# Altium PCB MainController.PcbDoc
Units mm, origin at the board's own origin, x right, y up, seen from the top; angles counter-clockwise.
Board outline 106.75 x 62.05 mm, 4 copper layers (Top Layer, Int1 (GND), Int2 (GND), Bottom Layer), stack 1.369 mm thick; 112 components, 77 nets, 350 pads, 67 vias.
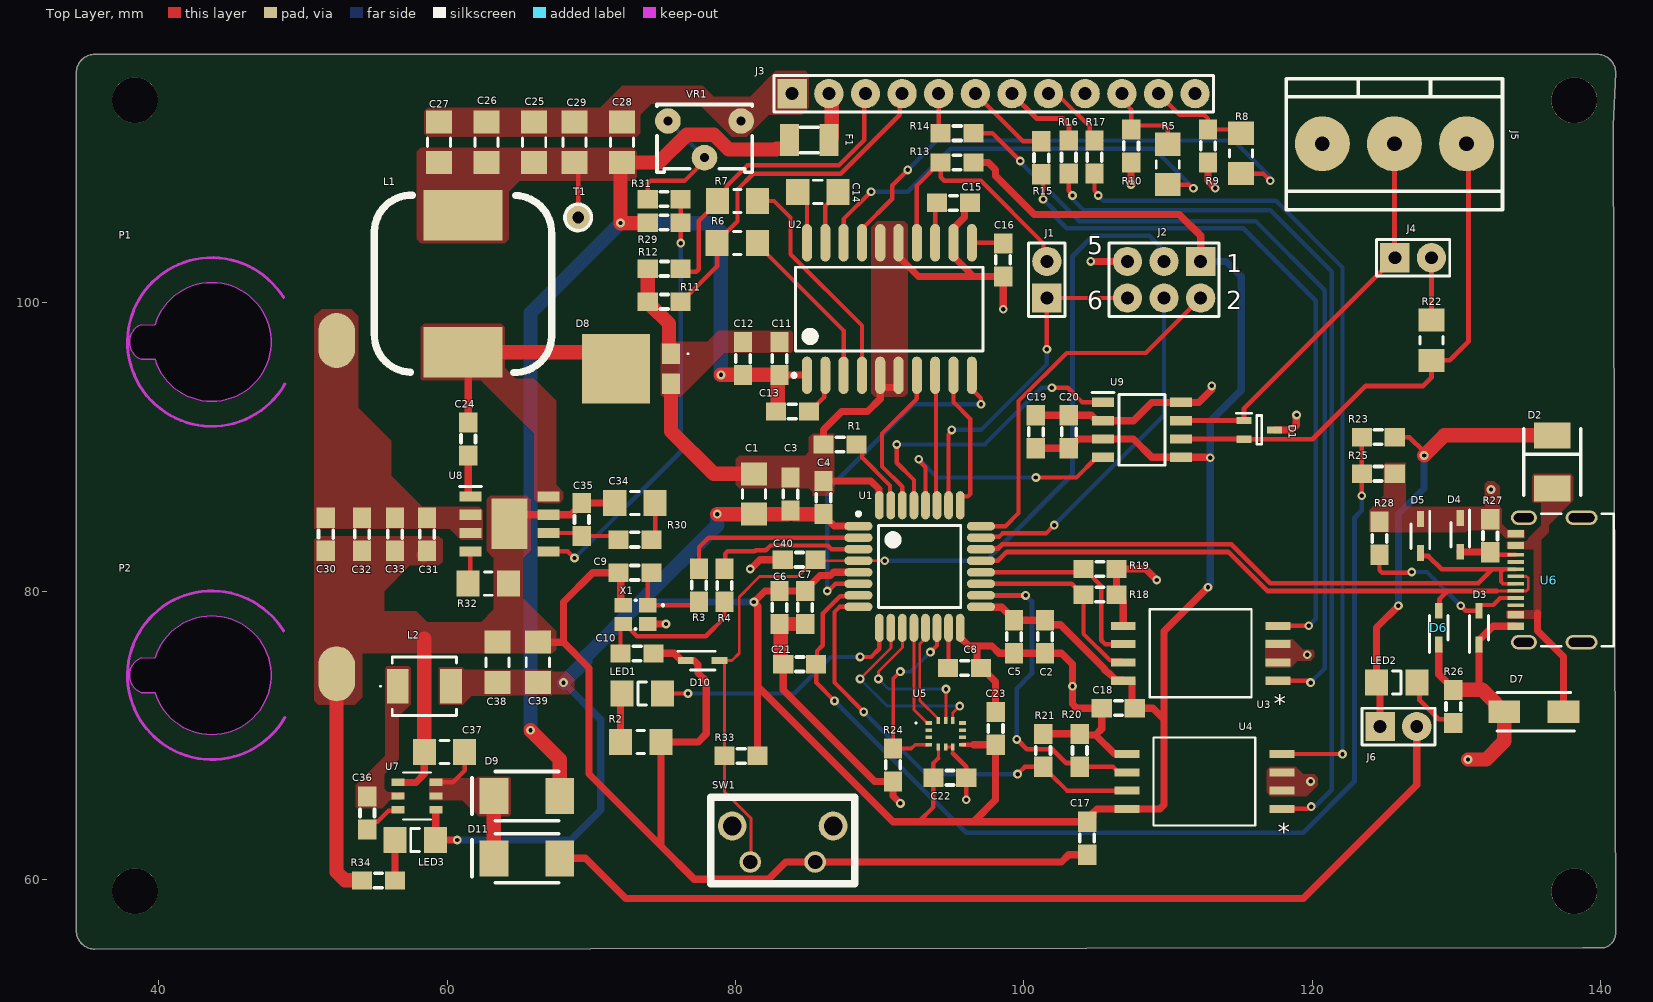
[diagram p0: Top Layer view]
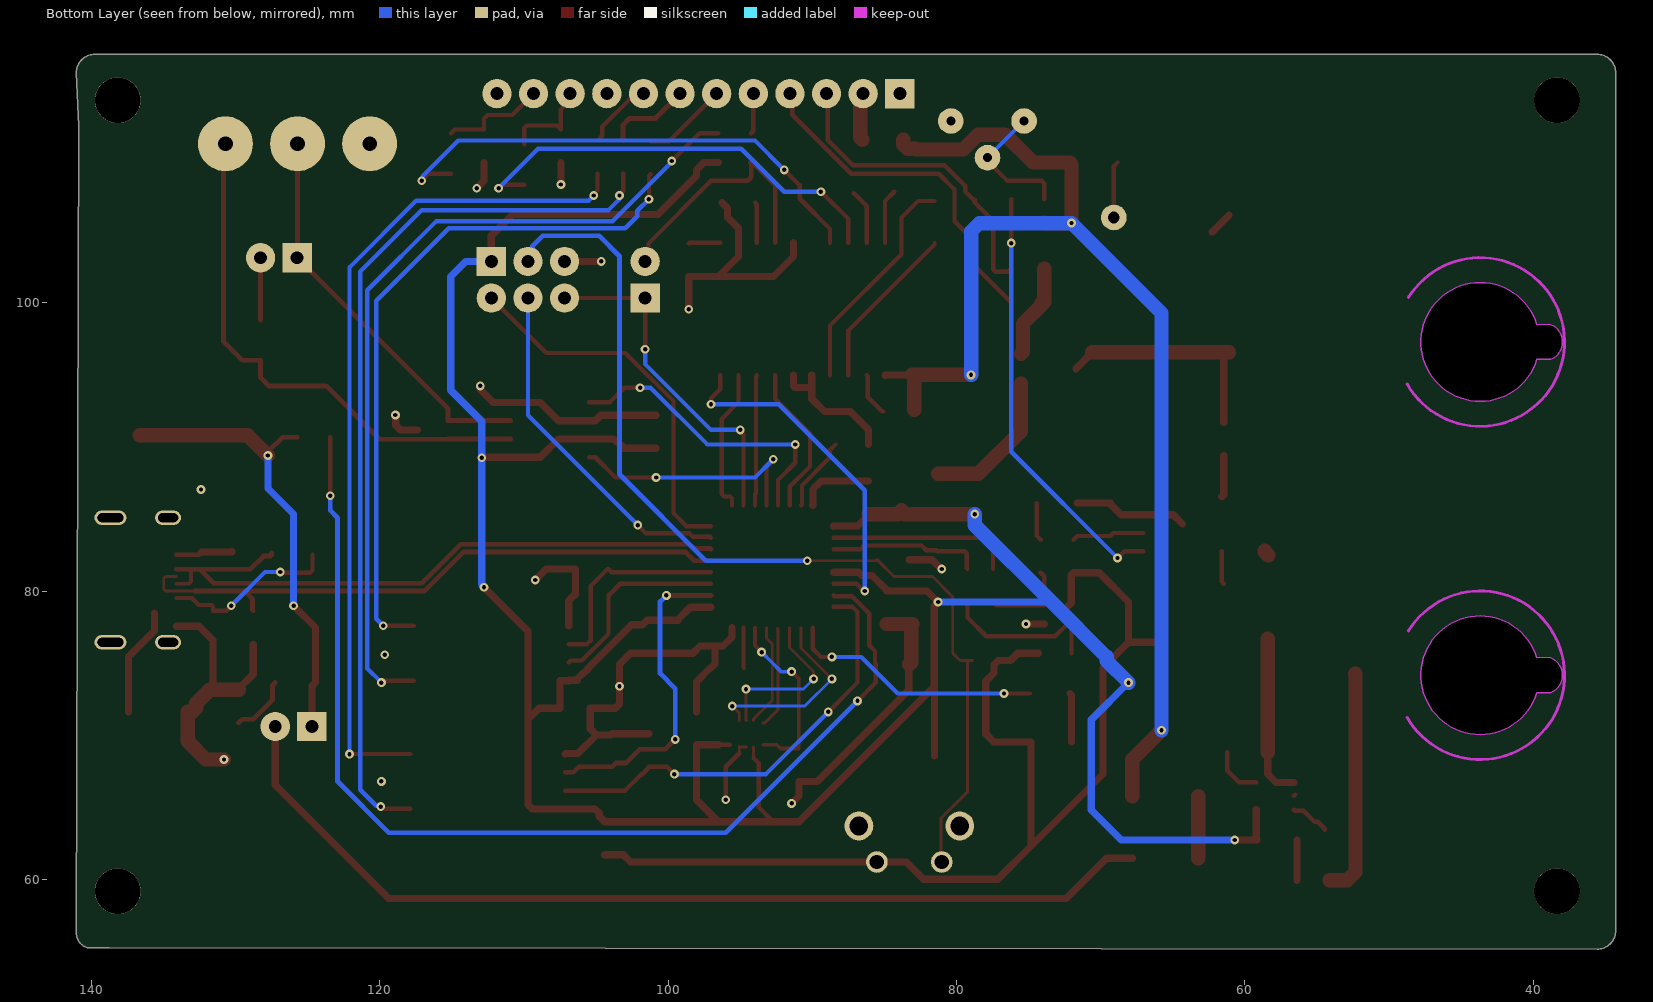
[diagram p1: Bottom Layer view, seen from below]
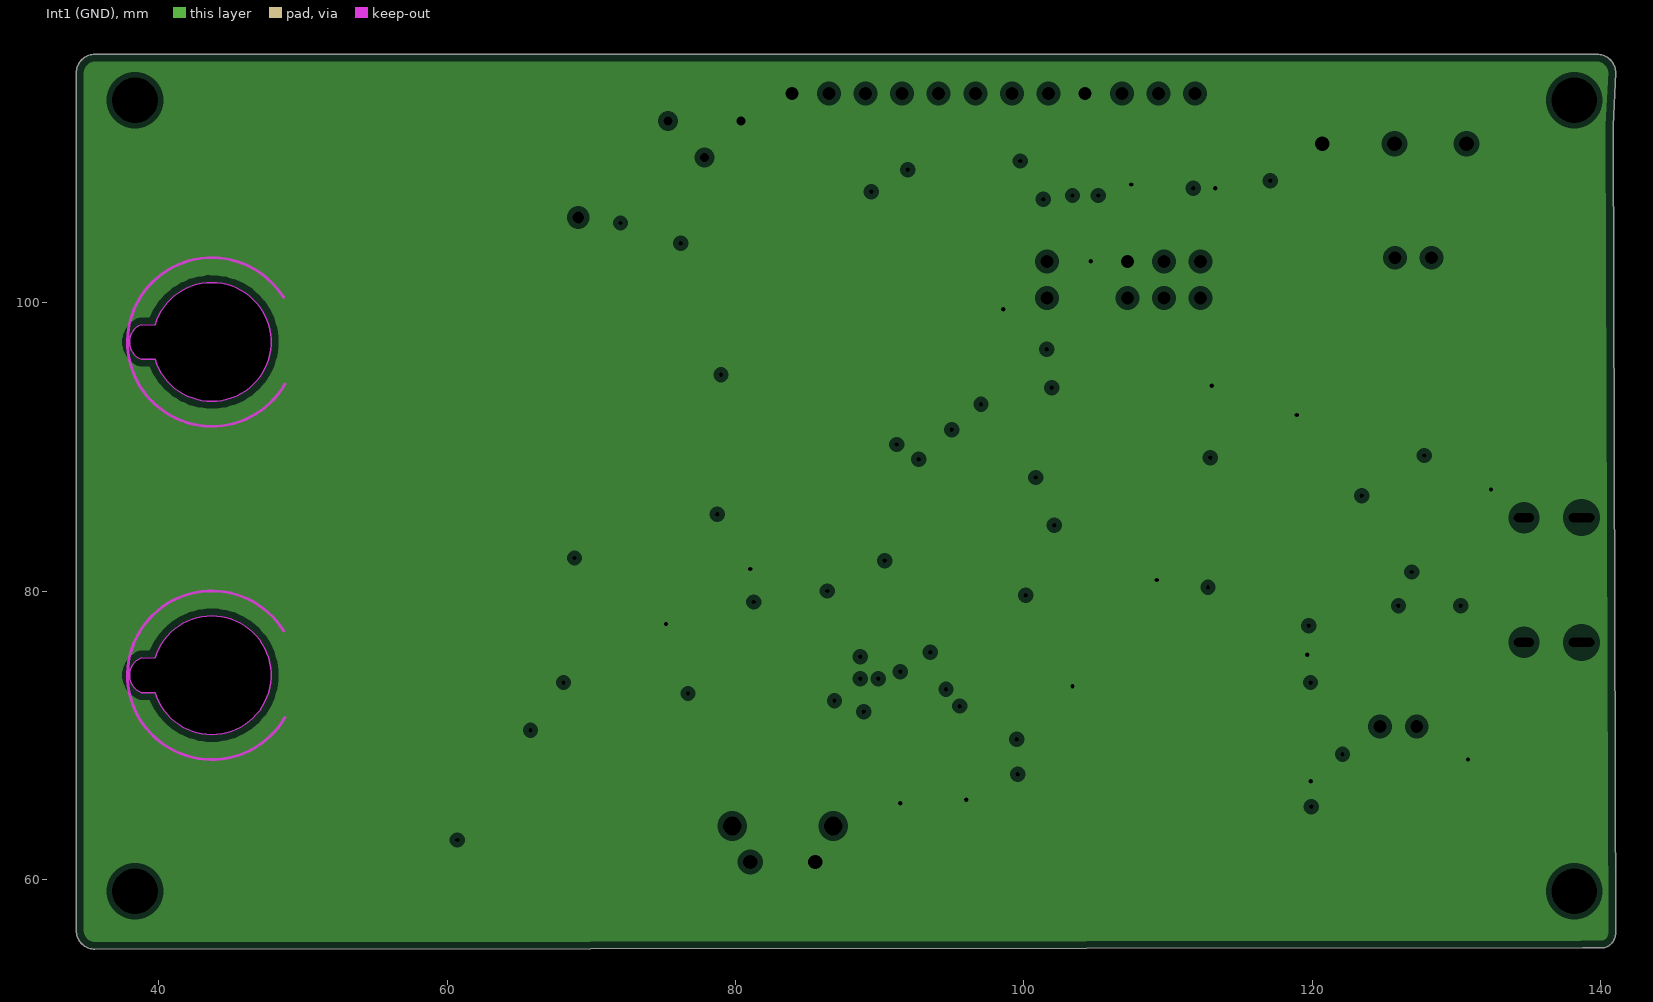
[diagram p2: Int1 (GND), clearances drawn from the general rule]
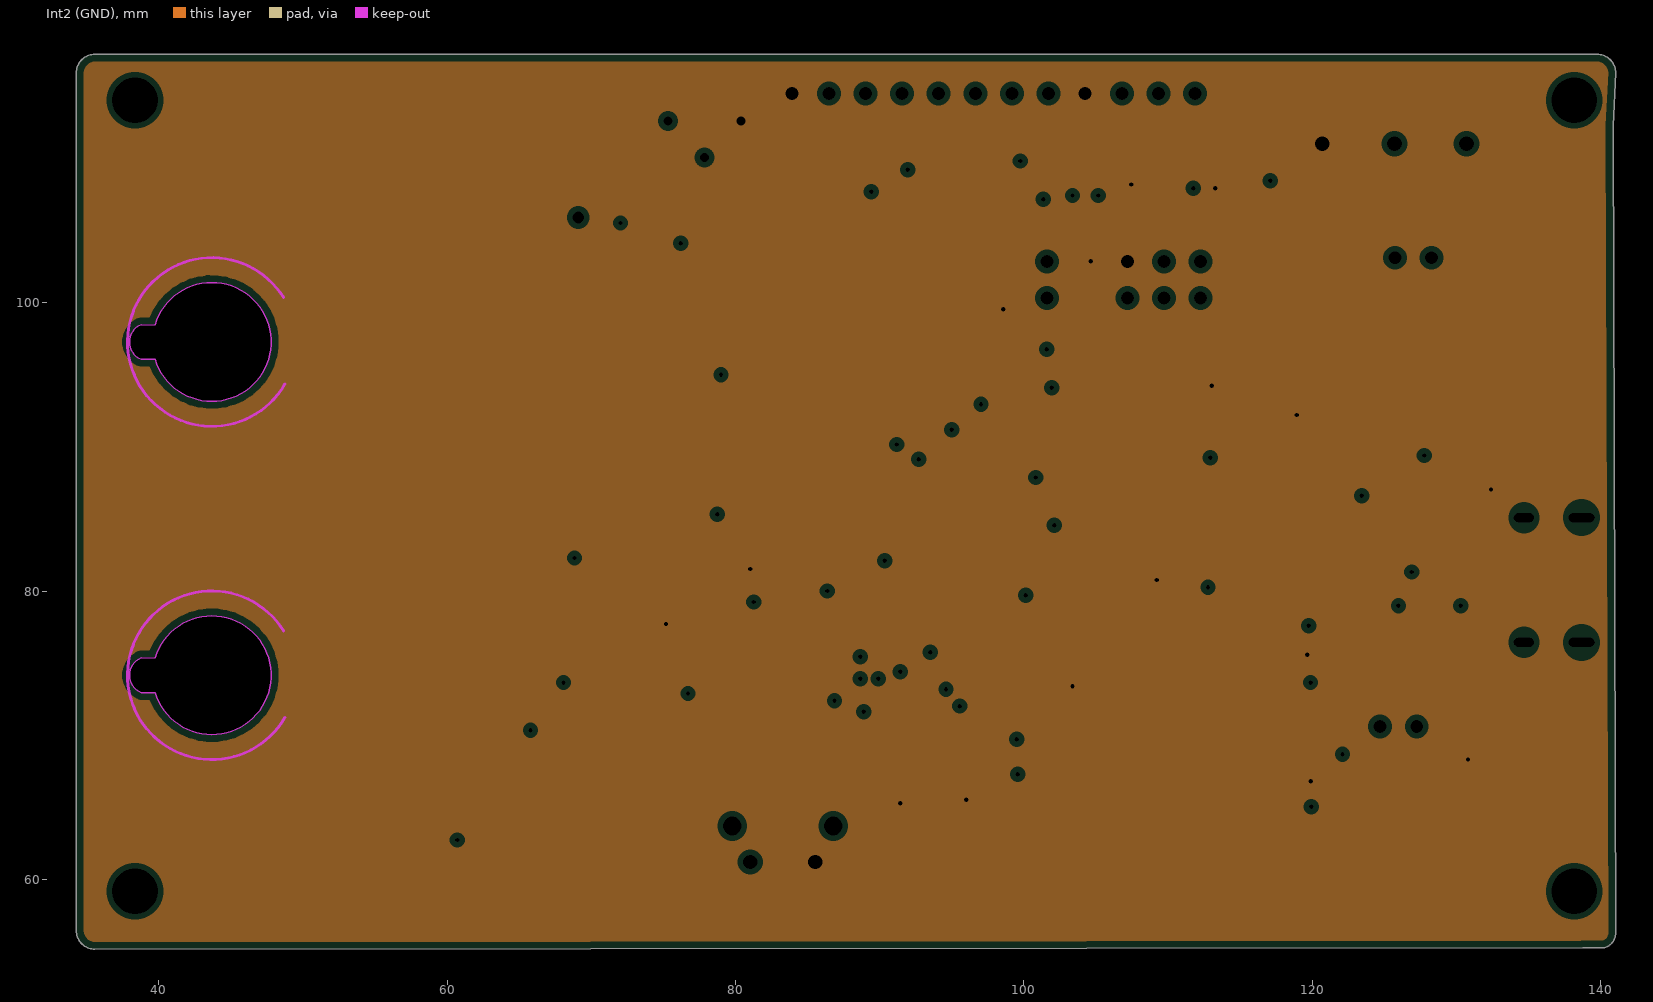
[diagram p3: Int2 (GND), clearances drawn from the general rule]
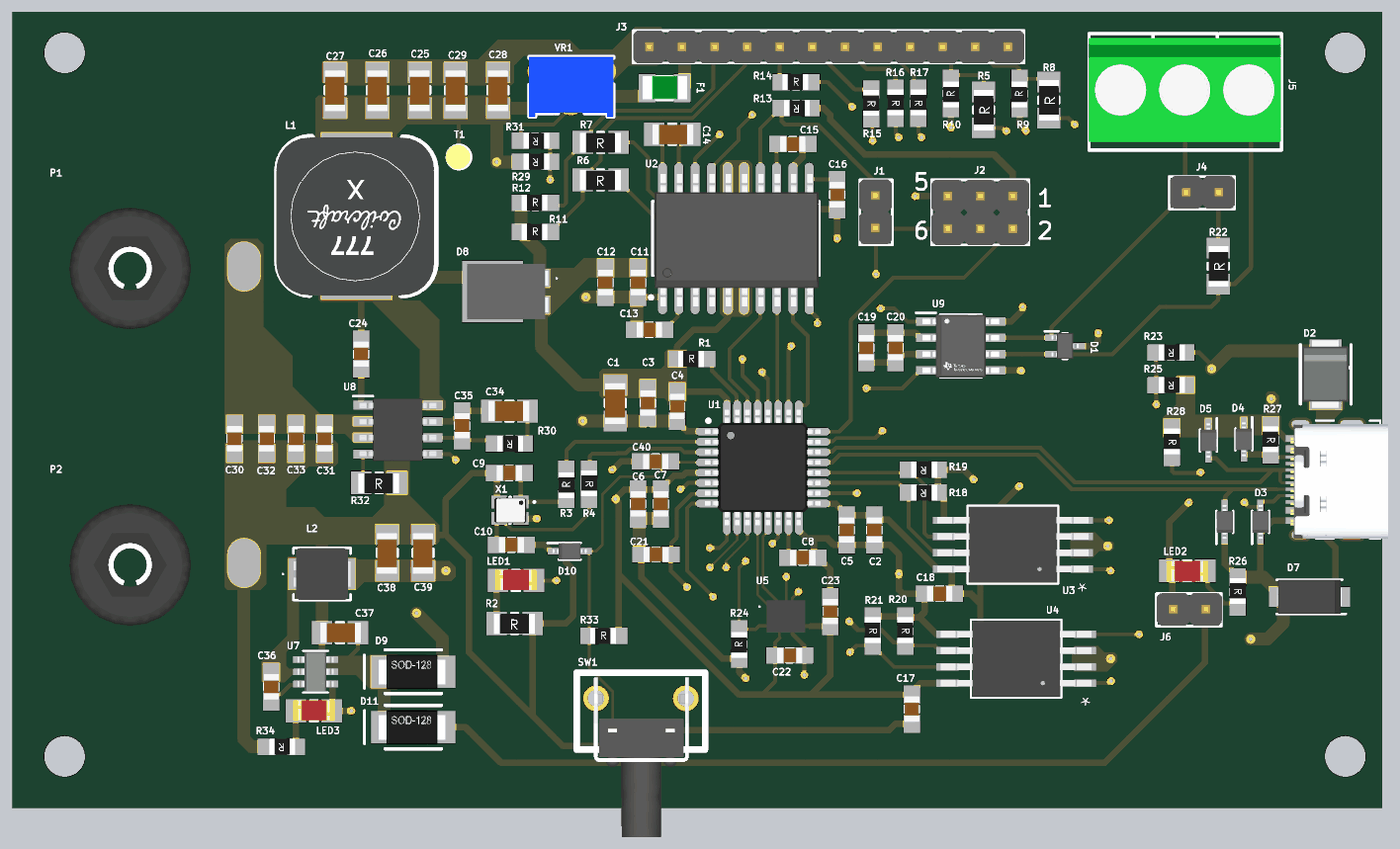
[diagram p4: 3D render of the assembled board from above, using the file's embedded part models]

## Layer stack, top to bottom
Top Solder: solder mask 0.0254, SM-001, Dk 4
Top Layer: signal copper 0.035
Dielectric 1: prepreg 0.1295, PP-017, Dk 4.3
Dielectric 2: prepreg 0.1295, PP-017, Dk 4.3
Int1 (GND): plane copper 0.035, net GND
Dielectric 3: core 0.7112, Core-039, Dk 4.8
Int2 (GND): plane copper 0.035, net GND
Dielectric 4: prepreg 0.1295, PP-017, Dk 4.3
Dielectric 5: prepreg 0.1295, PP-017, Dk 4.3
Bottom Layer: signal copper 0.035
Bottom Solder: solder mask 0.0254, SM-001, Dk 4

## Board outline
34.29,56.443 34.29,115.957 cw(c35.56,115.957) 35.56,117.227 139.775,117.227 cw(c139.775,115.957) 141.045,115.957 140.865,112.28 141.045,56.267 cw(c140.029,56.267) 140.029,55.251 138.759,55.251 35.56,55.173 cw(c35.56,56.443)

## Design rules (kind name [scope] priority, off if disabled: settings)
Clearance [All] p1: gap=0.2 ignorepadtopadclearanceinfootprint=TRUE
DiffPairsRouting [All] p1: maxlimit=0.203 minlimit=0.203 mostfreqgap=0.203 toplayer_minwidth=0.2 toplayer_maxwidth=0.333 toplayer_prefwidth=0.333 bottomlayer_minwidth=0.2 bottomlayer_maxwidth=0.333 bottomlayer_prefwidth=0.333 impedanceprofiledriven=TRUE impedanceprofileid={5F4F5FCA-476C-45F8-8010-128A441D675B} impedanceprofilevalue=90.000000 maxuncoupledlength=12.7
MinimumSolderMaskSliver MinimumSolderMaskSliver_1 [All] p1: minsoldermaskwidth=0.254
MinimumSolderMaskSliver [InComponent('U1')] p2: minsoldermaskwidth=0.05
PlaneClearance 48V [InNet('+48V')] p1: clearance=0.254
PlaneClearance [All] p2: clearance=0.381
PlaneConnect [All] p1: planeconnectstyle=Relief reliefexpansion=0.508 reliefentries=4 reliefconductorwidth=0.254 reliefairgap=0.254
PolygonConnect [All] p1: connectstyle=Direct reliefconductorwidth=0.254 reliefentries=4 polygonreliefangle="90 Angle" airgapwidth=0.254
RoutingVias [All] p1: holewidth=0.305 width=0.61 viastyle="Through Hole" minholewidth=0.305 minwidth=0.61 maxholewidth=0.305 maxwidth=0.61
SilkToSolderMaskClearance SilkToSolderMaskClearance_1 [IsPad] p1: minsilkscreentomaskgap=0 clearancetoexposedcopper=TRUE
SolderMaskExpansion [All] p1: expansion=0.051 istentingtop=FALSE
SupplyNets "Schematic Supply Nets_1" [InNet('GND')] p1: voltage=0.000
SupplyNets "Schematic Supply Nets" [InNet('+12V')] p2: voltage=0.000
SupplyNets "Schematic Supply Nets_7" [InNet('+48V')] p3: voltage=0.000
SupplyNets "Schematic Supply Nets_6" [InNet('+3V3')] p4: voltage=0.000
SupplyNets "Schematic Supply Nets_4" [InNet('+5V_USB')] p5: voltage=0.000
UnRoutedNet [All] p1: checkbadconnections=TRUE
Width [All] p1: maxlimit=1 minlimit=0.2 preferedwidth=0.3 minimp=50.000000 maximp=50.000000 favimp=50.000000
24 further rules are at their usual default settings.

## Classes and differential pairs
differential pair class DIFF_USB: USB
differential pair USB: +USB_DP+ -USB_DM-

## Components (designator, comment, footprint, x,y, rotation, side; value= is the part's Value field where it differs from the comment)
C1 "4.7uF" CAP_1206 81.28,88.138 r270 top
C2 "100nF" CAP_0805 101.474,75.692 r90 top
C3 "100nF" CAP_0805 83.82,87.884 r270 top
C4 "100nF" CAP_0805 86.106,87.63 r270 top
C5 "100nF" CAP_0805 99.314,75.692 r90 top
C6 "1uF" CAP_0805 83.058,77.724 r90 top
C7 "100nF" CAP_0805 84.836,77.724 r90 top
C8 "2.2uF" CAP_0805 94.742,74.676 r0 top
C9 "7pF" CAP_0805 74.168,81.28 r180 top
C10 "7pF" CAP_0805 72.029,75.678 r0 top
C11 "0.1uF" CAP_0805 83.058,97.282 r270 top
C12 "1uF" CAP_0805 80.518,97.282 r270 top
C13 "0.47uF" CAP_0805 85.09,92.456 r180 top
C14 "0.047uF" CAP_1206 84.322,107.696 r0 top
C15 "1nF" CAP_0805 96.266,106.934 r180 top
C16 "10nF" CAP_0805 98.57,101.829 r90 top
C17 "100nF" CAP_0805 104.394,61.722 r90 top
C18 "100nF" CAP_0805 105.41,71.882 r0 top
C19 "1uF" CAP_0805 100.838,92.202 r270 top
C20 "100nF" CAP_0805 103.124,92.202 r270 top
C21 "7pF" CAP_0805 83.312,74.93 r0 top
C22 "100nF" CAP_0805 93.726,67.056 r0 top
C23 "100nF" CAP_0805 98.044,71.628 r270 top
C24 "0.1uF" CAP_0805 61.468,89.408 r90 top
C25 "10uF" CAP_1206 66.04,112.528 r270 top
C26 "10uF" CAP_1206 62.738,112.528 r270 top
C27 "10uF" CAP_1206 59.436,112.528 r270 top
C28 "10uF" CAP_1206 72.136,112.528 r270 top
C29 "10uF" CAP_1206 68.834,112.528 r270 top
C30 "2.2uF" CAP_0805 51.594,82.804 r90 top
C31 "2.2uF" CAP_0805 58.612,82.804 r90 top
C32 "2.2uF" CAP_0805 54.102,82.804 r90 top
C33 "2.2uF" CAP_0805 56.388,82.804 r90 top
C34 "8.2nF" CAP_1206 74.428,86.106 r180 top
C35 "100pF" CAP_0805 69.342,83.82 r90 top
C36 "100nF" CAP_0805 54.468,63.461 r90 top
C37 "10uF" CAP_1206 58.42,68.834 r0 top
C38 "22uF" CAP_1206 63.5,76.46 r270 top
C39 "22uF" CAP_1206 66.294,76.46 r270 top
C40 "100nF" CAP_0805 83.276,82.178 r0 top
D1 "ESDCAN03-2BWY" SOT65P210X110-3N 116.332,91.186 r0 top
D2 "SSB43L" DO-214AA(SMB) 136.652,87.122 r90 top
D3 "TSD05CDYFR" SOD2613X100N 131.572,77.47 r90 top
D4 "TSD05CDYFR" SOD2613X100N 130.268,83.909 r270 top
D5 "TSD05CDYFR" SOD2613X100N 127.508,83.82 r270 top
D6 "TSD05CDYFR" SOD2613X100N 128.778,77.47 r90 top
D7 "SMAJ24A" DIOM5127X229N 135.382,71.628 r180 top
D8 "SS5P6-M3_87A" SS5P6M387A 72.763,95.426 r90 top
D9 "PMEG3050BEP" SOD-128 65.532,65.786 r0 top
D10 "TSD05CDYFR" SOD2613X100N 77.724,75.184 r0 top
D11 "PMEG3050BEP" SOD-128 65.532,61.468 r0 top
F1 "1206L035/16YR" MC36207 83.746,111.295 r0 top
J1 "HDR1X2V" HDR1X2_AUT 101.6,100.33 r90 top
J2 "HDR3X2" HDR2X3_AUT 112.268,102.87 r180 top
J3 "HDR1X12V" HDR1X12_AUT 83.938,114.507 r0 top
J4 "HDR1X2V" HDR1X2_AUT 125.73,103.124 r0 top
J5 "SCREWX3" SCREW3_AUT 120.706,111.031 r0 top
J6 "HDR1X2V" HDR1X2_AUT 124.714,70.612 r0 top
L1 "15uH" MSS1210 61.103,101.315 r180 top
L2 "3.3uH" SRP4020TA3R3M 58.42,73.406 r0 top
LED1 "LED-RED" LED1206R 74.93,72.898 r180 top
LED2 "LED-RED" LED1206R 124.46,73.66 r0 top
LED3 "LED-RED" LED1206R 59.182,62.738 r180 top
P1 "BS" Banana_AUT 43.688,97.282 r180 top
P2 "BS" Banana_AUT 43.688,74.168 r180 top
R1 "10k" RES_0805 86.106,90.17 r0 top
R2 "1k" RES_1206 72.029,69.542 r0 top
R3 "0R" RES_0805 77.47,79.265 r90 top
R4 "0R" RES_0805 79.235,81.551 r270 top
R5 "1k" RES_1206 109.982,108.198 r90 top
R6 "1k" RES_1206 78.734,104.14 r0 top
R7 "1k" RES_1206 78.74,107.062 r0 top
R8 "1k" RES_1206 115.062,108.96 r90 top
R9 "10k" RES_0805 112.776,109.728 r90 top
R10 "10k" RES_0805 107.442,109.728 r90 top
R11 "10k" RES_0805 73.914,100.076 r0 top
R12 "10k" RES_0805 73.914,102.362 r0 top
R13 "10k" RES_0805 96.52,109.728 r180 top
R14 "10k" RES_0805 94.234,111.76 r0 top
R15 "10k" RES_0805 101.219,111.203 r270 top
R16 "10k" RES_0805 103.124,111.252 r270 top
R17 "10k" RES_0805 104.902,111.252 r270 top
R18 "47k" RES_0805 106.426,79.756 r180 top
R19 "47k" RES_0805 106.426,81.534 r180 top
R20 "47k" RES_0805 103.886,70.104 r270 top
R21 "47k" RES_0805 101.346,70.104 r270 top
R22 "120R" RES_1206 128.27,96.012 r90 top
R23 "52k3" RES_0805 125.73,90.678 r180 top
R24 "47k" RES_0805 90.932,66.802 r90 top
R25 "64k9" RES_0805 125.73,88.138 r180 top
R26 "220R" RES_0805 129.794,73.152 r270 top
R27 "5k1" RES_0805 132.36,84.985 r270 top
R28 "5k1" RES_0805 124.665,84.81 r270 top
R29 "140k" RES_0805 76.2,105.558 r180 top
R30 "8k87" RES_0805 74.168,83.566 r180 top
R31 "9k1" RES_0805 76.2,107.188 r180 top
R32 "249k" RES_1206 61.462,80.518 r0 top
R33 "10k" RES_0805 79.248,68.58 r0 top
R34 "220R" RES_0805 56.388,59.937 r180 top
SW1 "EVQPF" EVQPF203M 83.276,63.714 r0 top
T1 "Terminal1" PAD1_AUT 69.088,105.918 r0 top
U1 "STM32C552KET6" 32A_M 92.78,81.708 r0 top
U2 "L6374FP" 20S_M 90.678,99.568 r90 top
U3 "ACPL-K64L-000E" STRETCHED_SO-8_AVA 112.268,75.692 r180 top
U4 "ACPL-K64L-000E" STRETCHED_SO-8_AVA 112.522,66.802 r180 top
U5 "BMI323" BMI323 94.575,70.104 r0 top
U6 "2171790001" 2171790001_MOL 137.414,80.772 r90 top
U7 "AP63203QWU-7" TSOT26_DIO 57.912,65.786 r180 top
U8 "RT6365GSP" SOIC127P600X175-9N 64.33,84.665 r0 top
U9 "TCAN3403DRQ1" "SOIC127P600X175-8N - duplicate" 108.204,91.186 r0 top
VR1 "2k" 3362S 77.855,111.338 r180 top
X1 "24MHz" CX2520SB 73.914,79.024 r180 top

## Footprints (in the part's own frame and the unit in brackets; to place one, negate y for a bottom-side part, rotate by r counter-clockwise, add the part's x,y. Pads: shape width x height; smd on the part's side, far side on the other; paste and mask are expansions set on the pad)
20S_M [mm] "SOIC, 20-Leads, Body 12.8x7.5mm, Pitch 1.27mm, IPC Low Density"
  oval 2.6x0.7 smd: 1(-4.6,5.715) 2(-4.6,4.445) 3(-4.6,3.175) 4(-4.6,1.905) 5(-4.6,0.635) 6(-4.6,-0.635) 7(-4.6,-1.905) 8(-4.6,-3.175) 9(-4.6,-4.445) 10(-4.6,-5.715) 11(4.6,-5.715) 12(4.6,-4.445) 13(4.6,-3.175) 14(4.6,-1.905) 15(4.6,-0.635) 16(4.6,0.635) 17(4.6,1.905) 18(4.6,3.175) 19(4.6,4.445) 20(4.6,5.715)
  silkscreen extent -4.72,-6.5 2.9,6.74, body extent -5.28,-6.45 5.02,6.35, height 2.65
32A_M [mm] "Thin QFP, 32-Leads, Body 7x7mm, Pitch 0.8mm, IPC Low Density"
  oval 1.95x0.6 smd: 1(-4.25,2.8) 2(-4.25,2) 3(-4.25,1.2) 4(-4.25,0.4) 5(-4.25,-0.4) 6(-4.25,-1.2) 7(-4.25,-2) 8(-4.25,-2.8) 17(4.25,-2.8) 18(4.25,-2) 19(4.25,-1.2) 20(4.25,-0.4) 21(4.25,0.4) 22(4.25,1.2) 23(4.25,2) 24(4.25,2.8)
  oval 0.6x1.95 smd: 9(-2.8,-4.25) 10(-2,-4.25) 11(-1.2,-4.25) 12(-0.4,-4.25) 13(0.4,-4.25) 14(1.2,-4.25) 15(2,-4.25) 16(2.8,-4.25) 25(2.8,4.25) 26(2,4.25) 27(1.2,4.25) 28(0.4,4.25) 29(-0.4,4.25) 30(-1.2,4.25) 31(-2,4.25) 32(-2.8,4.25)
  silkscreen extent -4.37,-2.85 2.85,3.77, body extent -4.5,-4.5 4.5,4.5, height 1.5
3362S [mil] "3362 - 1/4 ” Square Trimpot, Trimming Potentiometer"
  round 70 hole 25: 1(100,-50) 2(-100,-50) W(0,50)
  silkscreen extent -130,-95 130,90, body extent -130,-95 130,91, height 278
2171790001_MOL [mil]
  oval 39x87 hole 71 slot 24 at 0 deg paste-99999 mask-43.5: 13(-170.08,-50.07) 14(170.08,-50.07)
  oval 39x71 hole 55 slot 24 at 0 deg paste-99999 mask-35.5: 15(-170.08,107.41) 16(170.08,107.41)
  rect 20x45 smd paste+0 mask+0: A1/B12(-125.98,130.05) A4/B9(-94.49,130.05) B1/A12(125.98,130.05) B4/A9(94.49,130.05)
  rect 10x45 smd paste+0 mask+0: A5(-49.21,130.05) A6(-9.84,130.05) A7(9.84,130.05) A8(49.21,130.05) B5(68.9,130.05) B6(29.53,130.05) B7(-29.53,130.05) B8(-68.9,130.05)
  silkscreen extent -181,-138 181,61, body extent -182,-162 170,138, height 130
Banana_AUT [mm] "Power (11mm Diameter, 15.5mm Length)"
  oval 2.54x3.81 smd: 1(-8.65,-0.1)
  Keep-Out Layer board cut-out: 3.945,-1.205 2.834,-2.995 0.983,-4.002 -1.124,-3.962 -2.935,-2.885 -3.978,-1.054 -3.978,1.054 -2.935,2.885 -1.124,3.962 0.983,4.002 2.834,2.995 3.945,1.205 3.945,1.205 4.902,1.205 4.902,1.205 5.399,0.849 5.679,0.306 5.679,-0.306 5.399,-0.849 4.902,-1.205 4.902,-1.205 4.902,-1.205
  Keep-Out Layer lines w0.025: 4.902,1.205 cw(c4.416,0) 4.902,-1.205 3.945,-1.205 cw(c0.005,0) 3.945,1.205 4.902,1.205
  Keep-Out Layer lines w0.2: -4.969,-3.079 ccw(c0.005,0) -5.062,2.923
  body extent -5.17,-4.7 5.62,4.8, height 4.57
BMI323 [mm]
  rect 0.475x0.25 smd: 1(-1.163,0.75) 2(-1.163,0.25) 3(-1.163,-0.25) 4(-1.163,-0.75) 8(1.163,-0.75) 9(1.163,-0.25) 10(1.163,0.25) 11(1.163,0.75)
  rect 0.25x0.475 smd: 5(-0.5,-0.913) 6(0,-0.913) 7(0.5,-0.913) 12(0.5,0.913) 13(0,0.913) 14(-0.5,0.913)
  silkscreen extent -2.1,0.7 -2,0.8, body extent -1.5,-1.25 1.5,1.25, height 0.84
CAP_0805 [mil] "Body 2.0 x 1.3mm (LxW typ)"
  rect 55x50 smd: 1(0,0) 2(90,0)
  silkscreen extent 35,-20 56,20, body extent 6,-24 85,24, height 47
CAP_1206 [mm] "Body 3.2 x 1.6 mm (LxW typ)"
  rect 1.6x1.8 smd: 1(0,0) 2(2.8,0)
  silkscreen extent 1.1,-0.8 1.7,0.8, body extent -0.15,-0.81 3.05,0.79, height 1.6
CX2520SB [mm] "Crystal Units, Body 2.5×2.0 mm (LxW)"
  rect 1.2x1 smd: 1(0,0) 2(1.7,0) 3(1.7,1.3) 4(0,1.3)
  silkscreen extent -1.1,-0.35 0.87,1.65, body extent -0.45,-0.35 2.05,1.65, height 0.79
DIOM5127X229N [mm]
  rect 2.2x1.55 smd: 1(-2.05,0) 2(2.05,0)
  silkscreen extent -2.83,-1.33 2.55,1.33, body extent -2.55,-1.33 2.55,1.33, height 2.29
DO-214AA(SMB) [mm] "Body 3.9x4.57mm"
  rect 1.8x2.5 smd: A(0,0) K(3.679,0)
  silkscreen extent -0.45,-1.97 4.15,1.97, body extent -0.82,-1.78 4.58,1.83, height 2.3
EVQPF203M [mm] "PANASONIC  EVQPF203M  SWITCH, TACTILE, SPST-NO, 20mA, 15VDC"
  round 2 hole 1.3: 0(-3.5,0) 0(3.5,0)
  round 1.5 hole 1: 1(-2.25,-2.5) 2(2.25,-2.5)
  silkscreen extent -5,-4 5,2, body extent -3.67,-10.87 3.73,1.63, height 7
HDR1X2_AUT [mil] "Connector; Header; 2 Position; Pitch 2.54mm, Straight"
  rect 80x80 hole 35.43: 1(0,0)
  round 80 hole 35.43: 2(100,0)
  silkscreen extent -50,-50 150,50, body extent -48,-48 152,52, height 399
HDR1X12_AUT [mil] "Connector; Header; 12 Position; Pitch 2.54mm, Straight"
  rect 80x80 hole 35.43: 1(0,0)
  round 80 hole 35.43: 2(100,0) 3(200,0) 4(300,0) 5(400,0) 6(500,0) 7(600,0) 8(700,0) 9(800,0) 10(900,0) 11(1000,0) 12(1100,0)
  silkscreen extent -50,-50 1150,50, body extent -50,-50 1150,50, height 398
HDR2X3_AUT [mil] "Connector; Header; 3x2 Position"
  rect 80x80 hole 35.43: 1(0,0)
  round 80 hole 35.43: 2(0,100) 3(100,0) 4(100,100) 5(200,0) 6(200,100)
  silkscreen extent -50,-50 250,150, body extent -50,-50 250,150, height 398
LED1206R [mm] "SMD; Red LED; Body 3.2 x 1.6 mm"
  rect 1.6x1.8 smd: A(0,0) K(2.8,0)
  silkscreen extent 1.1,-0.8 1.7,0.8, body extent -0.2,-0.84 3,0.76, height 1.09
MC36207 [mm] "FUSE, PTC RESET. 3.5x1.8x0.75mm (LxWxH)"
  rect 1.3x2.2 smd: 1(0,0) 2(2.75,0)
  silkscreen extent 0.75,-0.9 1.98,0.88, body extent -0.35,-0.88 3.15,0.92, height 0.75
MSS1210 [mm] "AEC-Q200 MSS1210 Series, Pitch 9.5mm, Body 12.3x12.3mm"
  rect 5.5x3.5 smd: 1(0,4.75) 2(0,-4.75)
  silkscreen extent -6.15,-6.15 6.15,6.15, body extent -6.05,-6.12 6.25,6.18, height 10.16
PAD1_AUT [mil] "Teminal Pad; 70 x 70 mil; Hole, 32mil"
  round 70 hole 32: 1(0,0)
  silkscreen extent -36,-36 36,36, body extent -40,-37 34,37, height 319
RES_0805 [mil] "Body 2.0 x 1.3mm (LxW typ)"
  rect 55x50 smd: 1(0,0) 2(90,0)
  silkscreen extent 35,-20 56,20, body extent 3,-25 82,24, height 20
RES_1206 [mm] "Body 3.2 x 1.6 mm (LxW typ)"
  rect 1.6x1.8 smd: 1(0,0) 2(2.8,0)
  silkscreen extent 1.14,-0.8 1.65,0.8, body extent -0.21,-0.8 2.96,0.75, height 0.6
SCREW3_AUT [mil] "PCB Terminal Interlocking Block; CMM; 3 Poles; Pitch, 5 mm"
  round 150 hole 40: 1(0,0) 2(196.85,0) 3(393.7,0)
  silkscreen extent -98,-180 492,178, body extent -100,-155 490,164, height 394
SOD2613X100N [mm]
  rect 1.1x0.5 smd: 1(-1.175,0) 2(1.175,0)
  silkscreen extent -1.73,-0.65 0.85,0.65, body extent -1.33,-0.65 1.33,0.65, height 1
SOD-128 [mm] "SMD, 2 Lead, Body 4.0x2.7mm"
  rect 2x2.5 smd: A(2.286,0) K(-2.286,0)
  silkscreen extent -3.81,-1.7 2.2,1.7, body extent -2.7,-1.37 2.5,1.33, height 1.11
"SOIC127P600X175-8N - duplicate" [mm]
  rect 1.528x0.65 smd: 1(-2.711,1.905) 2(-2.711,0.635) 3(-2.711,-0.635) 4(-2.711,-1.905) 5(2.711,-1.905) 6(2.711,-0.635) 7(2.711,0.635) 8(2.711,1.905)
  silkscreen extent -3.47,-2.45 1.6,2.58, body extent -3,-2.45 3,2.45, height 1.75
SOIC127P600X175-9N [mm]
  rect 1.522x0.7 smd: 1(-2.714,1.905) 2(-2.714,0.635) 3(-2.714,-0.635) 4(-2.714,-1.905) 5(2.714,-1.905) 6(2.714,-0.635) 7(2.714,0.635) 8(2.714,1.905)
  rect 2.5x3.5 smd: 9(0,0)
  silkscreen extent -3.47,2.6 -1.95,2.6, body extent -3,-2.45 3,2.45, height 1.46
SOT65P210X110-3N [mm]
  rect 1.05x0.5 smd: 1(-1.05,0.65) 2(-1.05,-0.65) 3(1.05,0)
  silkscreen extent -1.57,-1 0.18,1.15, body extent -1.05,-1 1.05,1, height 1.1
SRP4020TA3R3M [mm]
  rect 1.5x2.4 smd: 1(-1.85,0) 2(1.85,0)
  silkscreen extent -3.1,-2.03 2.22,2.03, body extent -2.22,-2.03 2.22,2.03, height 1.77
SS5P6M387A [mm]
  rect 1.4x1.27 smd: 1(1.04,-2.765) 2(-1.04,-2.765)
  rect 4.8x4.72 smd: 3(0,1.04)
  silkscreen extent 0.99,-4 1.09,-3.9, body extent -2.15,-3.27 2.15,3.05, height 1.3
STRETCHED_SO-8_AVA [mil]
  rect 68x22 smd paste+0 mask+0: 1(-211.5,75) 2(-211.5,25) 3(-211.5,-25) 4(-211.5,-75) 5(211.5,-75) 6(211.5,-25) 7(211.5,25) 8(211.5,75)
  silkscreen extent -139,-120 139,120, body extent -231,-115 231,115, height 130
TSOT26_DIO [mil]
  rect 35.5x20 smd paste+0 mask+0: 1(-51.25,37.4) 2(-51.25,0) 3(-51.25,-37.4) 4(51.25,-37.4) 5(51.25,0) 6(51.25,37.4)
  silkscreen extent -39,-64 39,64, body extent -55,-59 55,59, height 39

## Part data
C1 C14 C25 C26 C27 C28 C29 C34 C37 C38 C39: library part "CAPN 1206", "Non Polarized Capacitor, SMD, 1206"
C2 C3 C4 C5 C6 C7 C8 C9 C10 C11 C12 C13 C15 C16 C17 C18 C19 C20 C21 C22 C23 C24 C30 C31 C32 C33 C35 C36 C40: library part "CAPN 0805", "Non Polarized Capacitor, SMD, 0805"
D1: "TVS Diode (Uni-directional)", Manufacturer_Name=STMicroelectronics, Mouser Part Number=511-ESDCAN03-2BWY, Arrow Part Number=ESDCAN03-2BWY, Arrow Price/Stock=https://www.arrow.com/en/products/esdcan03-2bwy/stmicroelectronics.html?utm_currency=USD&region=europe, Datasheet Link=https://www.st.com/resource/en/datasheet/esdcan03-2bwy.pdf, Height=1.1mm, Manufacturer_Part_Number=ESDCAN03-2BWY, Mouser Price/Stock=https://www.mouser.co.uk/ProductDetail/STMicroelectronics/ESDCAN03-2BWY?qs=FqY30PPN9V2iiokjuqa22Q%3D%3D
D2: "Schottky Diode, 4A, 30v", Supplier Part Number 1=1336556, Supplier 1=Farnell
D3 D4 D5 D6 D10: "TVS Diode (Bi-directional)", Manufacturer_Name="Texas Instruments", Mouser Part Number=595-TSD05CDYFR, Arrow Part Number=TSD05CDYFR, Arrow Price/Stock=https://www.arrow.com/en/products/tsd05cdyfr/texas-instruments.html?utm_currency=USD&region=nac, Datasheet Link=https://www.ti.com/lit/ds/symlink/tsd05c.pdf?ts=1691730725852&ref_url=https%253A%252F%252Fwww.ti.com%252Fproduct%252FTSD05C%253FkeyMatch%253DTSD05CDYFR%2526tisearch%253Dsearch-everything%2526usecase%253DOPN, Height=1mm, Manufacturer_Part_Number=TSD05CDYFR, Mouser Price/Stock=https://www.mouser.co.uk/ProductDetail/Texas-Instruments/TSD05CDYFR?qs=Imq1NPwxi74wAiGFX0POZQ%3D%3D
D7: "TVS Diode (Uni-directional)", Manufacturer_Name=Vishay, Mouser Part Number=78-SMAJ24A, Datasheet Link=https://www.vishay.com/docs/88390/smaj50a.pdf, Height=2.29mm, Manufacturer_Part_Number=SMAJ24A, Mouser Price/Stock=https://www.mouser.co.uk/ProductDetail/Vishay-General-Semiconductor/SMAJ24A?qs=N78E2i60HJ5M5XdBeXM0ag%3D%3D
D8: "Schottky Diode", Arrow Part Number=SS5P6-M3/87A, Manufacturer_Name=Vishay, Mouser Part Number=625-SS5P6-M3/87A, Arrow Price/Stock=https://www.arrow.com/en/products/ss5p6-m387a/vishay?utm_currency=USD&region=nac, Datasheet Link=https://www.vishay.com/docs/88988/ss5p6.pdf, Height=1.2mm, Manufacturer_Part_Number=SS5P6-M3/87A, Mouser Price/Stock=https://www.mouser.co.uk/ProductDetail/Vishay-General-Semiconductor/SS5P6-M3-87A?qs=XGzIaZb%2FFYLx0h%2FWoI%2FVUQ%3D%3D
D9 D11: "Schottky REC, 30V, 5A, SMD", Supplier Part Number 1=1829196, Supplier 1=Farnell
F1: "Fuse, PTC Reset, 350mA Hold, 750mA Tripping, 16v", Supplier Part Number 1=1822203, Supplier 1=Element14
J1 J4 J6: "Header, Plug, 2.54mm, 2 Pins, Straight", Supplier Part Number 1=2254030, Supplier 1=Farnell
J2: "Header, 3-Pin, Dual row, 2.54mm Pitch, Straight", Supplier Part Number 1=9733574, Supplier 1=Farnell
J3: "Header, Plug, 2.54mm, 12 Pins, Straight", Supplier Part Number 1=9732543, Supplier 1=Farnell
J5: "Terminal Block, PCB, 3Way, Pitch 5mm", Supplier Part Number 1=9632689, Supplier 1=Farnell
L1: library part MSS1210-153MED, "Inductor, 15uH, 8.7A , AEC-Q200 MSS1210 Series", Supplier Part Number 1=2288331, Supplier 1=Farnell
L2: library part SRP4020TA-3R3M, "Inductor", Manufacturer_Name=Bourns, Mouser Part Number=652-SRP4020TA-3R3M, Arrow Part Number=SRP4020TA-3R3M, Arrow Price/Stock=https://www.arrow.com/en/products/srp4020ta-3r3m/bourns?region=nac, Datasheet Link=https://www.bourns.com/docs/Product-Datasheets/SRP4020TA.pdf, Height=2mm, Manufacturer_Part_Number=SRP4020TA-3R3M, Mouser Price/Stock=https://www.mouser.co.uk/ProductDetail/Bourns/SRP4020TA-3R3M?qs=Ph8%2FHnX6CQx4K7XcRwo6CA%3D%3D
LED1 LED2 LED3: library part "SMD 1206 LED-RED", "RED LED, Case 1206", Supplier Part Number 1=8530017, Supplier 1=Farnell
P1 P2: library part "Banana Socket", "Banana Socket, 4mm, Panel, Black, 10A", Supplier Part Number 1=1101113, Supplier 1=Farnell
R1 R3 R4 R9 R10 R11 R12 R13 R14 R15 R16 R17 R18 R19 R20 R21 R23 R24 R25 R26 R27 R28 R29 R30 R31 R33 R34: library part "Resistor 0805", "Resistor, SMD, 0805"
R2 R5 R6 R7 R8 R22 R32: library part "Resistor 1206", "Resistor, SMD, 1206"
SW1: "PANASONIC  EVQPF203M  SWITCH, TACTILE, SPST-NO, 20mA, 15VDC", Supplier Part Number 1=2079505, Supplier 1=Farnell
T1: "Terminal, Pad 70x70mil, Hole 32 mil"
U1: "Arm? Cortex?-M33 32-bit MCU with FPU, 144 MHz, 593 CoreMark?, up to 512Kbyte dualbank flash memory, 128-Kbyte RAM", Manufacturer_Name=STMicroelectronics, Supplier Part Number 1=497-STM32C552KET6-ND, Datasheet Link=https://www.st.com/resource/en/datasheet/stm32c551cc.pdf, Geometry.Height=1.6mm, Manufacturer_Part_Number=STM32C552KET6, Supplier 1=DigiKey
U2: "INDUSTRIAL QUAD LINE DRIVER", Manufacturer_Name=STMicroelectronics, Copyright="Copyright (C) 2025 Ultra Librarian. All rights reserved.", Manufacturer_Part_Number=L6374FP, RefDes=RefDes, Type=Type
U3 U4: "Description", Manufacturer_Name="Avago Technologies", Copyright="Copyright (C) 2026 Ultra Librarian. All rights reserved.", Manufacturer_Part_Number=ACPL-K64L-000E, RefDes=RefDes, Type=Type
U5: "Integrated Circuit", Manufacturer_Name=BOSCH, Mouser Part Number=262-BMI323, Arrow Part Number=BMI323, Arrow Price/Stock=https://www.arrow.com/en/products/bmi323/bosch-sensortec?utm_currency=USD&region=nac, Datasheet Link=https://www.bosch-sensortec.com/media/boschsensortec/downloads/datasheets/bst-bmi323-ds000.pdf, Height=0.87mm, Manufacturer_Part_Number=BMI323, Mouser Price/Stock=https://www.mouser.co.uk/ProductDetail/Bosch-Sensortec/BMI323?qs=By6Nw2ByBD3%2FE1v0UqNQPQ%3D%3D
U6: "Universal Serial Bus (USB) Shielded I/O Receptacle, Type C, Right-Angle, Top Mount, Surface Mount, Single Row, 16 Circuits, Gold (Au) Plating", Manufacturer_Name="Molex Connector Corporation", Copyright="Copyright (C) 2025 Ultra Librarian. All rights reserved.", Manufacturer_Part_Number=2171790001, RefDes=RefDes, Type=Type
U7: "Description", Manufacturer_Name="Diodes Inc", Copyright="Copyright (C) 2026 Ultra Librarian. All rights reserved.", Manufacturer_Part_Number=AP63203QWU-7, RefDes=RefDes, Type="Power Management"
U8: "Integrated Circuit", Manufacturer_Name=RICHTEK, Mouser Part Number=835-RT6365GSP, Datasheet Link=https://www.richtek.com/assets/product_file/RT6365/DS6365-02.pdf, Height=1.753mm, Manufacturer_Part_Number=RT6365GSP, Mouser Price/Stock=https://www.mouser.co.uk/ProductDetail/Richtek/RT6365GSP?qs=amGC7iS6iy%252BGHkAL3RFUug%3D%3D
U9: "Integrated Circuit", Manufacturer_Name="Texas Instruments", Mouser Part Number=595-TCAN3403DRQ1, Arrow Part Number=TCAN3403DRQ1, Arrow Price/Stock=https://www.arrow.com/en/products/tcan3403drq1/texas-instruments?utm_currency=USD&region=nac, Datasheet Link=https://www.ti.com/lit/ds/symlink/tcan3403-q1.pdf?ts=1732780388772&ref_url=https%253A%252F%252Fwww.ti.com%252Fproduct%252FTCAN3403-Q1%252Fpart-details%252FTCAN3403DRQ1, Height=1.75mm, Manufacturer_Part_Number=TCAN3403DRQ1, Mouser Price/Stock=https://www.mouser.co.uk/ProductDetail/Texas-Instruments/TCAN3403DRQ1?qs=VVKQmw408U8i3BeOClYB9g%3D%3D
VR1: library part 3362S-1-202LF, "3362S Series, 1/4 ” Square  Potentiometer, 2k, 10%, 0.5 Watts, 1Turn", Supplier Part Number 1=2321842, Supplier 1=Farnell
X1: library part CX2520SB24000D0FLJZZ, "Crystals, 24MHz", Supplier Part Number 1=1657889, Supplier 1=Farnell

## Free pads (board coordinates)
  round 3.175 hole 3.175 unplated: 1(38.354,59.182) 1(38.354,114.046) 1(138.176,59.182) 1(138.176,114.046)

## Via types
v1: diameter 0.61, hole 0.305, Top Layer to Bottom Layer, 67 vias

## Nets (pads, with @x,y where several pads share a name; then routed paths per layer and width w, separated by ;. In a path a pad name is that pad's centre, name@x,y a point inside that pad or via, vN(x,y) a via of type N, cw(c..) or ccw(c..) an arc to the next point about the centre after c; other vN are vias at no path point)
+3V3: C1.2 C2.2 C3.2 C4.2 C5.2 C6.2 C7.2 C17.2 C18.2 C19.2 C20.2 C22.1 C23.2 C38.2 C39.2 J2.1 L2.2 LED3.A R13.1 R33.2 U1.1 U1.5 U1.17 U3.8 U4.8 U5.5 U5.8 U7.1 U9.3 U9.5 | length 216.2
  Top Layer w0.2: 94.075,68.421 U5.5
  Top Layer w0.3: 92.71,64.008 93.726,65.024 C22.1 93.726,68.072 94.075,68.421 ; U5.8 95.75,69.342 96.52,69.342
  Top Layer w0.5: LED3.A v1(60.706,62.738) ; LED3.A@59.214,62.77 U7.1 ; R33.2 81.534,73.406 90.932,64.008 92.71,64.008 96.52,64.008 ; 81.549,73.391 81.549,78.949 81.28,79.218 v1(81.28,79.248) 82.042,80.01 C6.2 C7.2 84.836,80.073 85.856,81.093 86.59,81.093 86.805,81.308 U1.5 ; C4.2 86.106,85.281 86.859,84.527 88.511,84.527 U1.1 ; 96.52,69.342 C23.2 98.044,65.532 96.52,64.008 ; R13.1 97.536,109.728 98.044,109.22 98.044,108.803 100.72,106.127 110.789,106.127 112.268,104.648 J2.1 ; U1.17 97.049,78.889 98.467,78.889 99.314,78.041 C5.2 C2.2 101.789,77.663 102.553,77.663 105.582,74.634 105.582,74.591 105.846,74.328 105.889,74.328 106.282,73.934 106.282,73.816 106.866,73.816 U3.8 107.48,73.787 107.51,73.758 C18.2@107.51,71.882 ; C19.2 C20.2 103.124,89.98 103.509,90.365 103.573,90.365 103.759,90.551 U9.3 107.607,90.551 108.877,89.281 U9.5 112.903,89.281 v1(112.926,89.258) ; C18.2 108.966,71.882 109.728,71.12 ; v1(112.776,80.264) 109.728,77.216 109.728,71.12 ; 96.52,64.008 C17.2 104.779,64.393 104.779,64.604 105.072,64.897 U4.8 109.435,64.897 109.728,65.19 109.728,71.12
  Top Layer w1: v1(78.74,85.344) 78.746,85.338 C1.2 83.624,85.338 C3.2@83.82,85.534 ; C3.2 C3.2@83.82,85.534 ; C4.2 84.074,85.344 84.018,85.4 83.955,85.4 C3.2@83.82,85.534
  Bottom Layer w0.5: v1(60.706,62.738) 68.58,62.738 70.658,64.816 70.658,71.074 v1(68.072,73.66) ; 73.406,79.248 v1(81.28,79.248) ; J2.1 114.037,102.87 115.077,101.83 115.077,93.94 112.926,91.789 v1(112.926,89.258) ; v1(112.776,80.264) 112.776,80.294 112.937,80.455 v1@112.937,89.247
  Bottom Layer w1: v1(68.072,73.66) 69.596,75.184 69.596,75.438 73.406,79.248 78.74,84.582 v1(78.74,85.344)
+5V_USB: D11.A J6.2 | length 67.9
  Top Layer w0.5: D11.A 69.596,61.468 72.39,58.674 119.38,58.674 127.254,66.548 J6.2
+12V: C11.2 C12.2 C13.2 C25.2 C26.2 C27.2 C28.2 C29.2 D9.A F1.1 L1.2 R29.2 T1.1 U2.1 | length 93.9
  Top Layer w0.3: C29.2 69.088,109.474 T1.1
  Top Layer w0.5: L1.2 L1.2@62.266,104.902 ; C13.2 C13.2@82.931,92.583 ; C11.2@82.931,94.869 C11.2 84.935,94.996 U2.1
  Top Layer w1: v1(65.786,70.358) 67.818,68.326 D9.A ; R29.2 73.887,105.531 v1(72.03,105.531) 72.03,109.622 C28.2 74.683,109.728 76.611,111.657 78.513,111.657 79.538,110.632 82.81,110.632 82.873,110.695 83.396,110.695 83.696,110.995 F1.1@83.696,111.295 ; v1(78.994,94.996) C11.2 ; C13.2@82.931,92.583 C11.2@82.931,94.869
  Bottom Layer w1: v1(65.786,70.358) 65.786,99.288 v1(72.03,105.531) 78.408,105.531 78.994,104.945 v1(78.994,94.996)
+48V: C30.2 C31.2 C32.2 C33.2 P1.1 U8.2 U8.3
AND1IN1: R14.2 U3.1 | length 58.8
  Top Layer w0.3: R14.2 97.819,111.76 v1(99.747,109.832) ; U3.1 119.677,73.787 119.804,73.66 v1(119.888,73.66)
  Bottom Layer w0.3: v1(99.747,109.832) 99.747,109.758 103.84,105.665 116.077,105.665 120.866,100.876 120.866,74.638 v1(119.888,73.66)
AND1IN2: R16.2 U4.1 | length 61.9
  Top Layer w0.3: R16.2 103.124,107.773 103.378,107.519 v1(103.378,107.442) ; U4.1 119.683,64.897 119.846,65.059 v1(119.929,65.059)
  Bottom Layer w0.3: v1(103.378,107.442) 103.437,107.383 103.437,107.129 104.14,106.426 117.094,106.426 121.366,102.154 121.366,74.431 121.356,74.421 121.356,66.231 120.243,65.119 119.989,65.119 v1@119.936,65.066
AND2IN1: R15.2 U3.4 | length 48.7
  Top Layer w0.3: R15.2 101.337,108.799 v1(101.337,107.183) ; U3.4 v1(119.761,77.597)
  Bottom Layer w0.3: v1(101.337,107.183) 102.14,106.379 102.14,105.997 102.972,105.165 115.226,105.165 120.253,100.138 120.253,78.089 v1(119.761,77.597)
AND2IN2: R17.2 U4.4 | length 58.6
  Top Layer w0.3: R17.2 104.902,107.773 105.156,107.519 v1(105.156,107.442) ; U4.4 122.097,68.707 v1(122.106,68.698)
  Bottom Layer w0.3: v1(105.156,107.442) 105.512,107.086 117.475,107.086 122.106,102.455 v1(122.106,68.698)
BOOT0: R1.2 U1.31 | length 5.2
  Top Layer w0.3: R1.2 88.793,89.769 88.793,89.261 90.723,87.331 90.723,86.015 U1.31
BST: C36.1 U7.6 | length 2.7
  Top Layer w0.3: C36.1 54.468,63.525 54.953,64.01 55.172,64.01 55.933,64.772 56.546,64.772 U7.6
CAN_RXD: U1.28 U9.4 | length 17.3
  Top Layer w0.3: v1(92.71,89.154) 92.71,89.07 93.18,88.6 U1.28 ; v1(100.838,87.884) 103.657,87.884 105.054,89.281 U9.4
  Bottom Layer w0.3: v1(92.71,89.154) 93.98,87.884 v1(100.838,87.884)
CAN_TXD: U1.29 U9.1 | length 21.1
  Top Layer w0.3: v1(91.186,90.17) 91.186,88.9 92.38,87.706 U1.29 ; v1(101.949,94.111) 103.043,94.111 104.063,93.091 U9.1
  Bottom Layer w0.3: v1(91.186,90.17) 97.282,90.17 101.223,94.111 v1(101.949,94.111)
CANH: D1.1 J4.1 J5.2 U9.7 | length 27.9
  Top Layer w0.333: U9.7 110.922,91.829 115.274,91.829 D1.1 115.282,92.676 J4.1 125.706,103.148 J5.2
CANL: D1.2 J5.3 R22.1 U9.6 | length 37.2
  Top Layer w0.333: U9.6 110.923,90.543 115.274,90.543 D1.2 120.023,90.536 123.727,94.239 127.709,94.239 128.27,94.8 R22.1 129.54,96.012 130.837,97.309 130.837,110.901 J5.3
DEBUG_SWCLK: J2.2 U1.24 | length 26.3
  Top Layer w0.3: U1.24 98.732,84.508 99.635,85.411 99.635,93.183 102.974,96.522 108.46,96.522 J2.2
DEBUG_SWDIO: J2.4 U1.23 | length 24.3
  Top Layer w0.3: U1.23 97.087,83.765 98.275,83.765 98.517,84.008 101.534,84.008 v1(102.108,84.582)
  Bottom Layer w0.3: v1(102.108,84.582) 109.728,92.202 J2.4
DEBUG_SWO: J1.1 J2.6 U1.26 | length 24
  Top Layer w0.3: U1.26 94.78,90.886 94.996,91.102 v1(94.996,91.186) ; v1(101.6,96.774) J1.1 J2.6
  Bottom Layer w0.3: v1(94.996,91.186) 97.028,91.186 101.6,95.758 v1(101.6,96.774)
GND: C1.1 C2.1 C3.1 C4.1 C5.1 C6.1 C7.1 C8.2 C9.2 C10.2 C11.1 C12.1 C15.1 C16.1 C17.1 C18.1 C19.1 C20.1 C21.1 C22.2 C23.1 C25.1 C26.1 C27.1 C28.1 C29.1 C30.1 C31.1 C32.1 C33.1 C34.2 C35.2 C37.1 C38.1 C39.1 C40.1 D1.3 D3.1 D4.1 D5.1 D6.1 D7.2 D8.1 D8.2 D10.1 J2.5 J3.1 J3.9 J5.1 P2.1 R1.1 R2.2 R9.1 R10.1 R11.1 R12.1 R18.1 R19.1 R20.1 R21.1 R24.1 R25.1 R26.1 R27.1 R28.1 R32.2 R34.2 SW1.2 U1.16 U1.32 U2.5 U2.6 U2.12 U2.15 U2.16 U3.2 U3.3 U3.5 U4.2 U4.3 U4.5 U5.6 U5.7 U6.A1/B12 U6.B1/A12 U7.4 U8.7 U8.9 U9.2 U9.8 VR1.2 X1.2 X1.4 | length 266.2
  Top Layer w0.2: U5.6 U5.7 95.075,68.755
  Top Layer w0.3: 95.075,68.755 96.012,67.818 C22.2 v1(96.012,65.532)
  Top Layer w0.5: U7.4 57.846,66.736 58.42,67.31 C37.1 ; U8.9 64.965,85.3 U8.7 ; C39.1 68.066,76.46 ; U8.7@67.132,85.3 68.6,85.3 69.342,86.042 C35.2 C34.2 ; X1.2 72.048,79.19 72.048,81.114 C9.2 70.104,81.28 68.066,79.242 68.066,76.46 ; X1.4 v1(75.184,77.724) ; C10.2 74.329,75.692 75.763,75.692 76.249,75.206 76.249,75.184 77.109,75.184 77.402,74.891 77.402,74.331 77.978,73.755 77.978,70.104 77.416,69.542 R2.2 74.829,62.331 ; v1(81.026,81.534) 81.056,81.534 81.7,82.178 C40.1 ; C21.1@83.287,74.93 83.312,74.905 83.312,73.152 89.662,66.802 R24.1 90.932,65.786 v1(91.44,65.278) ; C4.1 89.408,87.63 89.961,87.077 89.961,85.977 U1.32 ; R1.1 86.106,91.186 87.376,92.456 89.154,92.456 90.043,93.345 U2.5 ; U2.5@90.213,94.133 91.221,94.133 91.313,94.225 U2.6 ; U2.15 91.313,103.218 92.702,101.829 96.512,101.829 ; U1.16 95.58,76.81 96.19,76.2 96.52,76.2 ; C15.1 96.263,106.934 95.878,106.549 95.878,105.927 95.123,105.172 95.123,103.218 96.512,101.829 ; C23.1 98.044,73.724 97.091,74.676 C8.2 96.753,74.951 96.753,75.967 96.52,76.2 ; v1(98.57,99.55) C16.1 96.512,101.829 ; C19.1 C20.1 104.673,92.202 105.054,91.821 U9.2 107.607,91.821 108.877,93.091 U9.8 112.141,93.091 113.03,93.98 v1(113.03,94.234) ; R21.1 R20.1 103.962,70.028 104.978,70.028 ; C17.1 103.124,61.722 102.616,61.214 SW1.2 83.492,61.214 82.292,60.014 77.146,60.014 74.829,62.331 ; v1(104.648,102.87) J2.5 ; R18.1 R19.1 108.458,81.534 v1(109.22,80.772) ; R18.1@106.489,79.756 106.896,79.35 U3.5 ; U4.5 107.12,68.736 106.27,68.736 104.978,70.028 ; v1(107.442,108.204) R10.1 ; R9.1 112.776,108.458 v1(113.284,107.95) ; D1.3 118.579,91.186 118.899,91.506 118.899,92.196 v1(118.92,92.216) ; D6.1 128.778,74.231 129.794,73.215 R26.1 ; 131.808,73.152 131.572,73.388 D3.1 131.572,76.595 132.549,77.572 U6.A1/B12 ; v1@132.36,86.976 132.406,87.022 v1(132.406,87.052) ; 68.066,76.46 69.85,74.676 69.85,67.31 74.829,62.331 ; 96.52,76.2 97.79,76.2 98.298,75.692 C5.1 C2.1 102.616,75.692 103.378,74.93 v1(103.378,73.406) 103.378,72.175 103.671,71.882 C18.1 105.41,70.46 104.978,70.028
  Top Layer w1: P2.1 52.331,74.261 52.331,60.523 52.916,59.937 R34.2 ; C31.1@58.37,82.499 58.612,82.74 C31.1 ; C37.1 58.42,76.708 ; R11.1 R12.1 ; R11.1@73.971,100.076 73.977,100.076 74.112,99.941 74.112,99.84 75.393,98.56 75.393,96.601 D8.1 ; D8.2 75.528,91.096 78.486,88.138 C1.1 ; C21.1@83.287,74.93 83.152,75.065 83.152,77.63 C6.1 C7.1 ; R26.1 131.808,73.152 132.732,72.228 132.732,71.903 133.007,71.628 D7.2 133.332,69.578 132.08,68.326 v1(130.81,68.326)
  other v1: 119.888,66.802 119.663,75.593
IMU_INT1: R24.2 U1.14 U5.4 | length 12.7
  Top Layer w0.25: v1(91.44,74.422) 90.932,73.914 R24.2 92.202,69.088 92.468,69.354 U5.4 ; v1(93.524,75.773) 93.98,76.229 U1.14
  Bottom Layer w0.25: v1(91.44,74.422) 92.173,74.422 92.819,75.068 v1(93.524,75.773)
LED_R: LED3.K R34.1 | length 2.8
  Top Layer w0.5: LED3.K 56.388,62.732 R34.1
LiDAR_DIAG: J1.2 R13.2 U2.14 | length 17.7
  Top Layer w0.3: U2.14 92.583,108.14 94.17,109.728 R13.2@94.297,109.728 ; R13.2 94.234,108.712 94.488,108.458 97.028,108.458 101.371,104.115 101.371,103.099 J1.2
LiDAR_in1: J3.3 R7.1 R12.2 | length 22.2
  Top Layer w0.3: R12.2 76.416,102.146 77.275,102.146 77.451,102.322 77.451,105.673 78.74,106.962 R7.1@78.74,107.162 ; R7.1 79.39,107.712 79.39,108.092 80.838,109.54 87.186,109.54 88.932,111.286 88.932,114.421 J3.3
LiDAR_in2: J3.4 R6.1 R11.2 | length 24.4
  Top Layer w0.3: R11.2 76.263,100.076 78.734,102.547 R6.1 78.734,104.24 80.148,105.654 80.148,107.865 81.229,108.946 87.299,108.946 91.394,113.041 91.394,114.343 J3.4
LiDAR_in3: J3.10 R5.2 R10.2 | length 6.6
  Top Layer w0.3: J3.10 106.798,114.054 107.442,113.41 R10.2 107.726,112.298 109.809,112.298 109.985,112.123 109.985,111.001 R5.2
LiDAR_in4: J3.11 R8.2 R9.2 | length 7.3
  Top Layer w0.3: J3.11 110.815,113.03 112.522,113.03 112.776,112.776 R9.2 114.808,112.014 R8.2
lidar_Out1: R18.2 U1.19 U3.7 | length 13.7
  Top Layer w0.3: U1.19 103.324,80.508 104.076,79.756 R18.2 104.14,77.035 105.988,75.186 106.766,75.186 U3.7
LiDAR_Out1_24V: J3.5 R14.1 | length 2.8
  Top Layer w0.3: J3.5 94.098,111.896 R14.1
lidar_Out2: R19.2 U1.20 U3.6 | length 14.3
  Top Layer w0.3: U1.20 103.914,81.308 R19.2 104.203,81.534 105.378,80.36 105.378,76.588 105.639,76.327 U3.6
LiDAR_Out2_24V: J3.6 R15.1 | length 5.9
  Top Layer w0.3: J3.6 99.942,111.203 R15.1
lidar_Out3: R21.2 U1.8 U4.7 | length 30.5
  Top Layer w0.3: U1.8 87.225,78.908 86.868,78.551 86.868,73.66 v1(88.9,71.628) ; v1(99.568,67.31) 100.076,67.818 R21.2 ; R21.2@101.346,67.754 101.831,67.269 101.895,67.269 102.997,66.167 U4.7
  Bottom Layer w0.3: v1(88.9,71.628) 93.218,67.31 v1(99.568,67.31)
LiDAR_Out3_24V: J3.7 R16.1 | length 5.9
  Top Layer w0.333: J3.7 100.902,112.783 102.694,112.783 103.124,112.353 R16.1
lidar_Out4: R20.2 U1.18 U4.6 | length 22.3
  Top Layer w0.3: R20.2 106.185,67.818 106.566,67.437 U4.6
  Top Layer w0.333: U1.18 v1(100.124,79.708) ; v1(99.506,69.716) 99.526,69.716 100.203,69.039 101.984,69.039 102.946,68.077 103.627,68.077 R20.2
  Bottom Layer w0.333: v1(99.506,69.716) 99.506,73.239 100.558,74.291 100.558,79.274 v1(100.124,79.708)
LiDAR_Out4_24V: J3.8 R17.1 | length 4.9
  Top Layer w0.3: J3.8 102.049,114.176 102.617,114.176 104.568,112.225 104.568,111.586 R17.1
NetC9_1: C9.1 R3.1 X1.1 | length 6
  Top Layer w0.333: C9.1 73.914,81.026 X1.1 77.229,79.024 R3.1
NetC10_1: C10.1 R4.2 X1.3 | length 11
  Top Layer w0.3: C10.1 72.029,77.539 X1.3 ; X1.3@72.314,77.724 73.164,76.874 77.945,76.874 79.235,78.164 R4.2
NetC15_2: C15.2 U2.13 | length 2.8
  Top Layer w0.3: U2.13 93.853,106.807 C15.2
NetC24_1: C24.1 U8.1 | length 2.9
  Top Layer w0.5: C24.1 61.468,86.67 61.568,86.57 U8.1
NetC24_2: C24.2 D8.3 L1.1 U8.8 | length 16.1
  Top Layer w0.5: L1.1 61.468,96.2 C24.2 ; D8.3@70.584,96.565 D8.3
  Top Layer w1: L1.1 D8.3@70.584,96.565
NetC34_1: C34.1 R30.1 | length 2.6
  Top Layer w0.3: R30.1 74.428,83.826 C34.1
NetC35_1: C35.1 R30.2 U8.6 | length 5
  Top Layer w0.3: U8.6 69.132,84.03 C35.1 71.628,83.82 R30.2
NetC37_2: C37.2 D9.K D11.K U7.2 U7.3 | length 7.9
  Top Layer w0.3: U7.3 60.386,66.736 61.22,67.57 C37.2
  Top Layer w1: D11.K D9.K
NetD2_A: D2.A D7.1 U6.A4/B9 U6.B4/A9 | length 7.6
  Top Layer w0.5: 135.636,78.486 135.636,77.245 137.432,75.449 D7.1
NetD2_K: D2.K J6.1 LED2.A R23.1 | length 32.4
  Top Layer w0.333: R23.1 126.746,90.678 127.762,89.662 v1(127.762,89.408)
  Top Layer w0.5: J6.1 124.714,73.406 LED2.A 124.46,77.47 v1(125.984,78.994)
  Top Layer w1: v1(127.762,89.408) 129.155,90.801 D2.K
  Bottom Layer w0.5: v1(125.984,78.994) 125.984,85.344 127.762,87.122 v1(127.762,89.408)
NetD3_2: D3.2 R28.2 U6.A5 | length 12.3
  Top Layer w0.254: 133.012,79.499 133.035,79.522 U6.A5
  Top Layer w0.3: R28.2 124.665,81.456 124.841,81.28 126.86,81.28 v1(126.911,81.331) ; v1(130.302,78.994) 130.651,78.645 D3.2 131.572,78.945 131.672,79.045 132.558,79.045 133.012,79.499
  Bottom Layer w0.3: v1(126.911,81.331) 127.965,81.331 v1(130.302,78.994)
NetD4_2: D4.2 R27.2 U6.B5 | length 3.9
  Top Layer w0.3: R27.2 132.537,82.522 U6.B5
  Top Layer w0.5: D4.2 130.268,82.717 132.342,82.717 R27.2
NetF1_2: F1.2 J3.2 | length 3.4
  Top Layer w1: J3.2 86.675,114.31 86.675,113.58 86.693,113.563 86.693,111.442 F1.2@86.546,111.295
NetJ4_2: J4.2 R22.2 | length 4.3
  Top Layer w0.333: R22.2 J4.2
NetLED1_A: LED1.A U1.9 | length 17.8
  Top Layer w0.3: LED1.A v1(76.708,72.898) ; v1(88.646,75.438) 89.408,75.438 89.98,76.01 U1.9
  Bottom Layer w0.3: v1(76.708,72.898) 84.074,72.898 86.614,75.438 v1(88.646,75.438)
NetLED1_K: LED1.K R2.1 | length 3.4
  Top Layer w0.5: R2.1 72.029,72.797 LED1.K
NetLED2_K: LED2.K R26.2 | length 4.3
  Top Layer w0.333: LED2.K 127.443,73.477 127.443,72.455 128.778,71.12 129.54,71.12 R26.2
NetR29_1: R29.1 R31.1 U8.5 | length 29.9
  Top Layer w0.3: U8.5 68.37,82.76 v1(68.834,82.296) ; v1(76.2,104.14) R29.1 R31.1
  Bottom Layer w0.3: v1(68.834,82.296) 76.2,89.662 v1(76.2,104.14)
NetR31_2: R31.2 VR1.1 VR1.W | length 9.5
  Top Layer w0.3: R31.2 73.914,108.279 74.09,108.455 76.467,108.455 77.855,109.843 VR1.W
  Bottom Layer w0.3: VR1.1 VR1.W
NetR32_1: R32.1 U8.4 | length 2.3
  Top Layer w0.3: R32.1 61.616,80.672 U8.4
O1: R7.2 U2.4 | length 15.8
  Top Layer w0.3: R7.2 82.676,107.062 83.82,105.918 83.82,103.371 88.773,98.418 U2.4
O2: R6.2 U2.3 | length 11.6
  Top Layer w0.3: R6.2 81.534,104.04 87.503,98.071 U2.3
O3: R5.1 U2.18 | length 30.9
  Top Layer w0.3: U2.18 87.503,105.808 89.391,107.696 v1(89.408,107.696) ; R5.1 111.428,108.198 111.676,107.95 v1(111.76,107.95)
  Bottom Layer w0.3: v1(89.408,107.696) 91.948,107.696 94.929,110.677 109.033,110.677 v1(111.76,107.95)
O4: R8.1 U2.17 | length 35.9
  Top Layer w0.3: U2.17 88.773,105.118 90.873,107.218 90.873,108.145 v1(91.948,109.22) ; R8.1 116.592,108.96 v1(117.094,108.458)
  Bottom Layer w0.3: v1(91.948,109.22) 93.98,111.252 114.554,111.252 117.035,108.771 117.035,108.517 v1(117.094,108.458)
OSC_IN: R3.2 U1.2 | length 12.8
  Top Layer w0.3: R3.2 77.47,83.04 78.138,83.708 U1.2
OSC_OUT: R4.1 U1.3 | length 10.7
  Top Layer w0.3: R4.1 79.285,81.601 79.285,82.599 79.461,82.775 81.341,82.775 81.399,82.833 82.102,82.833 82.433,83.163 86.405,83.163 86.661,82.908 U1.3
REF_U5: C16.2 U2.11 | length 2.2
  Top Layer w0.3: U2.11 98.517,104.168 C16.2
RESET: C40.2 D10.2 J2.3 R33.1 SW1.1 U1.4 | length 70.3
  Top Layer w0.2: D10.2 D10.2@79.098,75.184 ; SW1.1 81.076,61.264 81.076,64.252 79.248,66.08 R33.1 79.248,75.034 D10.2@79.098,75.184 ; v1(90.358,82.108) U1.4 85.632,82.108 C40.2 85.499,82.178 84.329,81.008 81.67,81.008 80.264,79.603 80.264,75.692 79.756,75.184 D10.2@79.098,75.184
  Bottom Layer w0.333: v1(90.358,82.108) 97.393,82.108 103.378,88.093 103.378,103.243 104.783,104.648 108.712,104.648 109.403,103.957 109.403,103.195 J2.3
SlECT_LiDAR1: U1.30 U2.7 | length 10.6
  Top Layer w0.3: U1.30 91.58,87.236 90.17,88.646 90.17,90.932 92.583,93.345 U2.7
SlECT_LiDAR2: U1.27 U2.8 | length 9.1
  Top Layer w0.3: U2.8 93.908,94.913 93.908,86.786 93.98,86.714 U1.27
SlECT_LiDAR3: U1.25 U2.9 | length 10
  Top Layer w0.3: U2.9 95.123,93.111 96.288,91.946 96.288,86.737 96.113,86.561 95.719,86.561 95.58,86.422 U1.25
SlECT_LiDAR4: U1.6 U2.10 | length 24.8
  Top Layer w0.3: v1(86.36,80.01) 86.431,80.01 86.929,80.508 U1.6 ; U2.10 96.393,94.018 97.028,93.383 v1(97.028,92.964)
  Bottom Layer w0.3: v1(86.36,80.01) 86.36,86.997 92.327,92.964 v1(97.028,92.964)
SPI_MISO: U1.12 U5.1 | length 7.1
  Top Layer w0.2: U1.12@92.418,77.42 92.38,77.382 92.38,71.773 93.299,70.854 U5.1
SPI_MOSI: U1.13 U5.14 | length 7.1
  Top Layer w0.2: U1.13 93.18,76.734 92.78,76.334 92.78,72.424 94.075,71.129 U5.14
SPI_NSS: U1.10 U5.12 | length 13.3
  Top Layer w0.2: v1(88.646,73.914) 90.78,76.048 U1.10 ; U5.12 95.075,71.552 v1(95.553,72.03)
  Bottom Layer w0.2: v1(88.646,73.914) 90.53,72.03 v1(95.553,72.03)
SPI_SCK: U1.11 U5.13 | length 11.4
  Top Layer w0.2: v1(89.916,73.914) 89.916,74.422 91.58,76.086 U1.11 ; U5.13 94.59,71.032 94.59,73.193 v1(94.606,73.209)
  Bottom Layer w0.2: v1(89.916,73.914) 90.621,73.209 v1(94.606,73.209)
SW: C36.2 L2.1 U7.5 | length 0.1
  Top Layer w0.3: U7.5@56.506,65.89 U7.5
USB_BUSDETECT: C21.2 R23.2 R25.2 U1.7 | length 75.2
  Top Layer w0.3: v1(86.868,72.39) 85.598,73.66 C21.2 85.652,74.984 85.652,75.839 86.054,76.241 86.054,78.445 87.26,79.651 88.473,79.651 U1.7
  Top Layer w0.333: v1(123.444,86.614) R25.2 R23.2
  Bottom Layer w0.333: v1(86.868,72.39) 96.012,63.246 119.38,63.246 122.936,66.802 122.936,85.09 123.444,85.598 v1(123.444,86.614)
USB_DM-: D6.2 U1.21 U6.A7 U6.B7 | length 42.6
  Top Layer w0.2: 132.842,80.018 134.107,80.018 U6.B7 134.866,80.022 134.983,80.139 134.983,80.905 134.866,81.022 U6.A7
  Top Layer w0.333: U1.21@97.018,82.108 98.208,82.108 98.819,82.719 114.18,82.719 116.881,80.018 132.842,80.018 ; D6.2 128.825,78.692 128.825,79.438 129.343,79.956
USB_DP+: D5.2 U1.22 U6.A6 U6.B6 | length 46.3
  Top Layer w0.254: 133.303,81.522 133.092,81.311 133.092,80.671 133.241,80.522 U6.A6
  Top Layer w0.333: U1.22 97.081,82.959 98.199,82.959 98.495,83.255 114.402,83.255 117.103,80.555 131.527,80.555 132.495,81.522 ; D5.2@127.512,82.649 127.512,82.513 127.591,82.434 128.063,82.434 128.974,81.522 132.495,81.522 ; U6.B6 133.303,81.522 132.495,81.522
VC_U5: C14.1 U2.20 | length 3.8
  Top Layer w0.3: C14.1 84.963,107.055 U2.20
VCAP: C8.1 U1.15 | length 2.8
  Top Layer w0.3: C8.1 94.78,74.714 U1.15
VCP_U5: C13.1 U2.2 | length 3
  Top Layer w0.3: C13.1 85.154,92.456 86.156,93.459 86.156,94.891 U2.2
VPUMP_U5: C14.2 U2.19 | length 3.8
  Top Layer w0.3: U2.19 86.233,106.707 C14.2@87.122,107.596
pads on no net: J3.12 SW1.0 U5.2 U5.3 U5.9 U5.10 U5.11 U6.13 U6.14 U6.15 U6.16 U6.A8 U6.B8

## Polygon pours and split planes (outlines as drawn)
+12V on Top Layer "+12V_L01_P022" (solid, pour order 22): 58.166,104.14 57.912,104.394 57.912,110.49 58.166,110.744 72.898,110.744 73.152,110.49 73.152,108.712 72.898,108.458 65.024,108.458 64.262,107.696 64.262,104.394 64.008,104.14 60.96,104.14
NetC24_2 on Top Layer "NETC24_2_L01_P025" (solid, pour order 25): 66.472,86.13 66.447,86.106 66.294,86.106 66.04,86.36 66.04,90.932 62.346,94.626 58.282,94.626 58.166,94.742 58.166,98.298 58.42,98.552 63.754,98.552 64.008,98.298 64.008,95.504 64.77,94.742 66.04,94.742 67.564,93.218 67.564,87.376 68.072,86.868 68.072,86.36 67.818,86.106 66.294,86.106
GND on Top Layer "GND_L01_P024" (solid, pour order 24): 70.612,113.538 72.136,115.062 77.724,115.062 78.486,114.3 81.026,114.3 82.804,116.078 84.836,116.078 85.09,115.824 85.09,113.538 84.582,113.03 82.296,113.03 80.772,111.506 79.756,111.506 77.47,113.792 74.168,113.792 73.406,113.03 73.406,111.76 73.152,111.506 58.674,111.506 58.42,111.76 58.42,113.284 58.674,113.538
GND on Top Layer "GND_L01_P021" (solid, pour order 21): 78.044,97.282 78.819,98.057 78.833,98.044 83.829,98.044 83.959,97.914 83.959,96.659 83.82,96.52 79.248,96.52 76.2,93.472 74.93,93.472 74.803,93.599 74.81,93.606 74.81,97.162 74.93,97.282
NetD2_A on Top Layer "NETD2_A_L01_P020" (solid, pour order 20): 134.773,83.465 134.775,83.464 134.853,83.464 134.853,83.465 134.982,83.595 134.981,83.673 135.89,84.582 135.89,86.114 135.858,86.146 135.352,86.146 135.254,86.243 135.254,88.01 135.382,88.138 137.922,88.138 137.922,88.129 138.105,87.946 138.105,86.289 136.398,84.582 136.398,84.068 135.896,83.566 135.896,78.078 134.502,78.091 134.486,78.074 133.557,78.074 133.475,78.156 133.475,78.602 133.557,78.684 135.326,78.684 135.382,78.74 135.382,82.856 135.346,82.892 133.581,82.892 133.58,82.891 133.552,82.891 133.552,82.897 133.5,82.946 133.5,83.414 133.552,83.465
GND on Top Layer "GND_L01_P016" (solid, pour order 16): 86.868,90.932 86.868,86.868 86.614,86.614 85.344,86.614 85.344,86.868 85.09,87.122 80.264,87.122 80.01,87.376 80.01,89.154 80.264,89.408 84.836,89.408 85.09,89.662 85.09,90.678 85.344,90.932
GND on Top Layer "GND_L01_P014" (solid, pour order 14): 118.872,67.818 119.38,67.31 120.142,67.31 120.396,67.056 120.396,66.548 119.634,65.786 117.094,65.786 116.84,66.04 116.84,67.564 117.094,67.818
GND on Top Layer "GND_L01_P013" (solid, pour order 13): 120.03,75.946 120.14,75.836 120.142,75.688 120.142,75.438 119.888,75.184 119.007,75.184 118.499,74.676 116.805,74.676 116.74,74.742 116.74,76.561 116.748,76.569 116.748,76.615 116.792,76.659 118.667,76.659 119.38,75.946
GND on Top Layer "GND_L01_P012" (solid, pour order 12): 131.985,85.852 131.985,87.446 132.169,87.63 132.636,87.63 133.001,87.265 133.001,85.852 133.145,85.708 133.145,84.678 133.557,84.258 133.557,84.257 134.68,84.257 134.761,84.177 134.761,83.72 134.712,83.672 133.434,83.672 132.891,84.215 130.81,84.215 130.669,84.074 124.01,84.074 123.957,84.127 123.952,84.582 123.952,85.598 124.968,86.614 124.968,88.843 125.049,88.923 125.053,88.919 126.473,88.919 126.492,88.9 126.492,85.852
GND on Top Layer "GND_L01_P011" (solid, pour order 11): 89.408,105.248 89.824,105.664 91.694,105.664 91.948,105.41 91.948,93.726 91.694,93.472 89.662,93.472 89.408,93.726
+3V3 on Top Layer "+3V3_L01_P010" (solid, pour order 10): 67.337,74.422 67.222,74.54 61.23,74.54 61.064,74.706 59.464,74.706 59.436,74.678 59.436,72.186 59.486,72.136 61.061,72.136 61.063,72.138 61.072,72.131 61.704,72.762 64.446,72.762 64.454,72.755 67.226,72.755 67.226,72.759 67.31,72.844 68.526,72.844 68.834,73.152 68.834,73.914 68.326,74.422
NetC37_2 on Top Layer "NETC37_2_L01_P008" (solid, pour order 8): 58.782,67.018 58.786,67.022 62.033,67.022 62.141,67.13 64.297,67.13 64.399,67.027 64.399,64.515 64.265,64.38 62.178,64.38 61.049,65.509 58.8,65.509 58.778,65.53 58.778,67.009 58.794,67.024
SW on Top Layer "SW_L01_P007" (solid, pour order 7): 57.032,65.516 57.032,65.521 57.044,65.533 57.042,65.536 57.042,66.071 57.032,66.04 56.896,66.04 56.384,66.04 56.101,66.04 55.986,66.04 55.88,66.04 55.631,66.294 55.626,66.294 55.626,67.31 56.642,68.326 56.642,71.322 57.474,72.154 57.474,74.643 57.331,74.787 55.829,74.787 55.694,74.651 55.694,68.57 53.649,66.525 53.649,65.059 53.744,64.964 53.842,64.945 55.486,64.945 56.057,65.516
+48V on Top Layer "+48V_L01_P001" (solid, pour order 1): 53.848,92.71 56.134,90.424 56.134,88.011 58.293,85.852 62.23,85.852 62.484,85.598 62.484,83.566 60.96,83.566 60.198,84.328 50.8,84.328 50.8,99.06 51.308,99.568 53.34,99.568 53.848,99.06
GND on Top Layer "GND_L01_P000" (solid, pour order 0): 55.626,78.613 57.848,78.613 58.61,77.851 62.357,77.851 63.246,78.74 63.246,82.296 62.738,82.804 62.738,86.36 62.992,86.614 65.532,86.614 65.786,86.36 65.786,82.804 65.278,82.296 65.278,79.502 67.564,77.216 67.564,75.946 67.31,75.692 54.102,75.692 54.102,72.644 53.594,72.136 51.054,72.136 50.8,72.39 50.8,83.566 51.054,83.82 59.436,83.82 59.69,83.566 59.69,82.042 59.436,81.788 57.404,81.788 55.626,80.01
GND on Int1 (GND) (split plane): 139.996,116.688 140.134,116.63 140.259,116.547 140.365,116.441 140.448,116.317 140.505,116.179 140.534,116.032 140.534,115.97 140.356,112.305 140.356,112.292 140.355,112.279 140.534,56.266 140.534,56.217 140.515,56.12 140.477,56.028 140.421,55.945 140.351,55.875 140.268,55.819 140.176,55.781 140.078,55.762 138.759,55.762 138.758,55.762 35.56,55.684 35.485,55.684 35.338,55.713 35.2,55.77 35.076,55.853 34.97,55.959 34.887,56.083 34.83,56.222 34.8,56.368 34.8,56.443 34.8,115.957 34.8,116.032 34.83,116.179 34.887,116.317 34.97,116.441 35.076,116.547 35.2,116.63 35.338,116.688 35.485,116.717 139.849,116.717
GND on Int2 (GND) (split plane): 139.996,116.688 140.134,116.63 140.259,116.547 140.365,116.441 140.448,116.317 140.505,116.179 140.534,116.032 140.534,115.97 140.356,112.305 140.356,112.292 140.355,112.279 140.534,56.266 140.534,56.217 140.515,56.12 140.477,56.028 140.421,55.945 140.351,55.875 140.268,55.819 140.176,55.781 140.078,55.762 138.759,55.762 138.758,55.762 35.56,55.684 35.485,55.684 35.338,55.713 35.2,55.77 35.076,55.853 34.97,55.959 34.887,56.083 34.83,56.222 34.8,56.368 34.8,56.443 34.8,115.957 34.8,116.032 34.83,116.179 34.887,116.317 34.97,116.441 35.076,116.547 35.2,116.63 35.338,116.688 35.485,116.717 139.849,116.717

## Silkscreen, mask and mechanical layers (free items; w line width, h text height)
Mechanical 1:
  lines w0.381: 34.29,56.443 ccw(c35.56,56.443) 35.56,55.173 138.759,55.251 139.775,55.251 140.029,55.251 ccw(c140.029,56.267) 141.045,56.267 140.865,112.28 141.045,115.957 ccw(c139.775,115.957) 139.775,117.227 136.727,117.227 37.998,117.227 35.56,117.227 ccw(c35.56,115.957) 34.29,115.957 34.29,56.443

## Text inside footprints (layer, text, board x,y; h text height)
J2: Top Overlay "6" at 104.394,99.568 h1.27; Top Overlay "5" at 104.394,103.378 h1.27; Top Overlay "2" at 114.046,99.568 h1.27; Top Overlay "1" at 114.046,102.108 h1.27
U3: Top Overlay "*" at 118.212,73.355 h1.27 r180; Mechanical 13 "*" at 115.608,74.117 h1.27 r180
U4: Top Overlay "*" at 118.466,64.465 h1.27 r180; Mechanical 13 "*" at 115.862,65.227 h1.27 r180